# Altium PCB SDReaderPCB.PcbDoc
Units mil, origin at the board's own origin, x right, y up, seen from the top; angles counter-clockwise.
Board outline 6000 x 4000 mil, 2 copper layers (Top Layer, Bottom Layer); 18 components, 14 nets, 65 pads, 2 vias.
Unrouted connection lines stored in the file: 45.
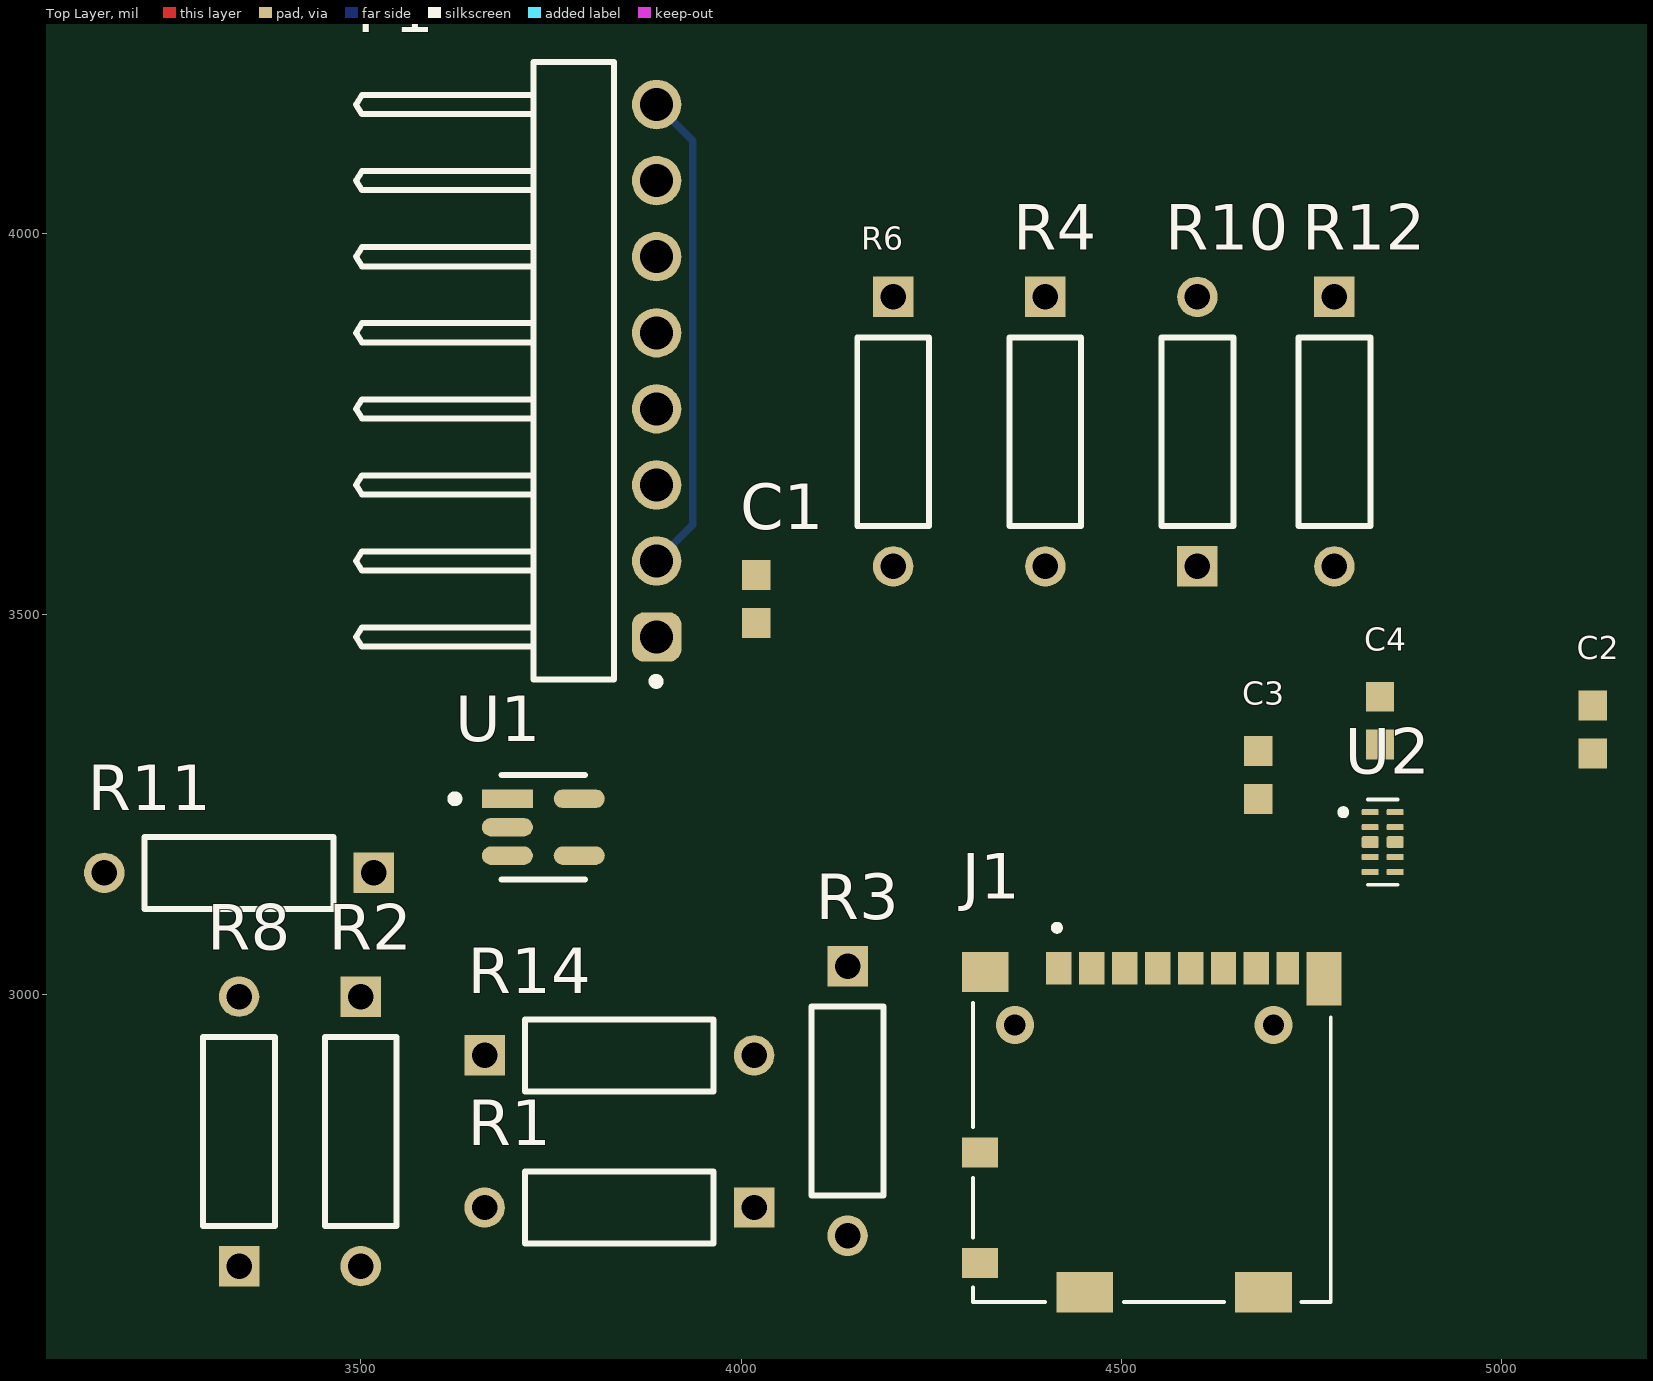
[diagram p0: Top Layer view]
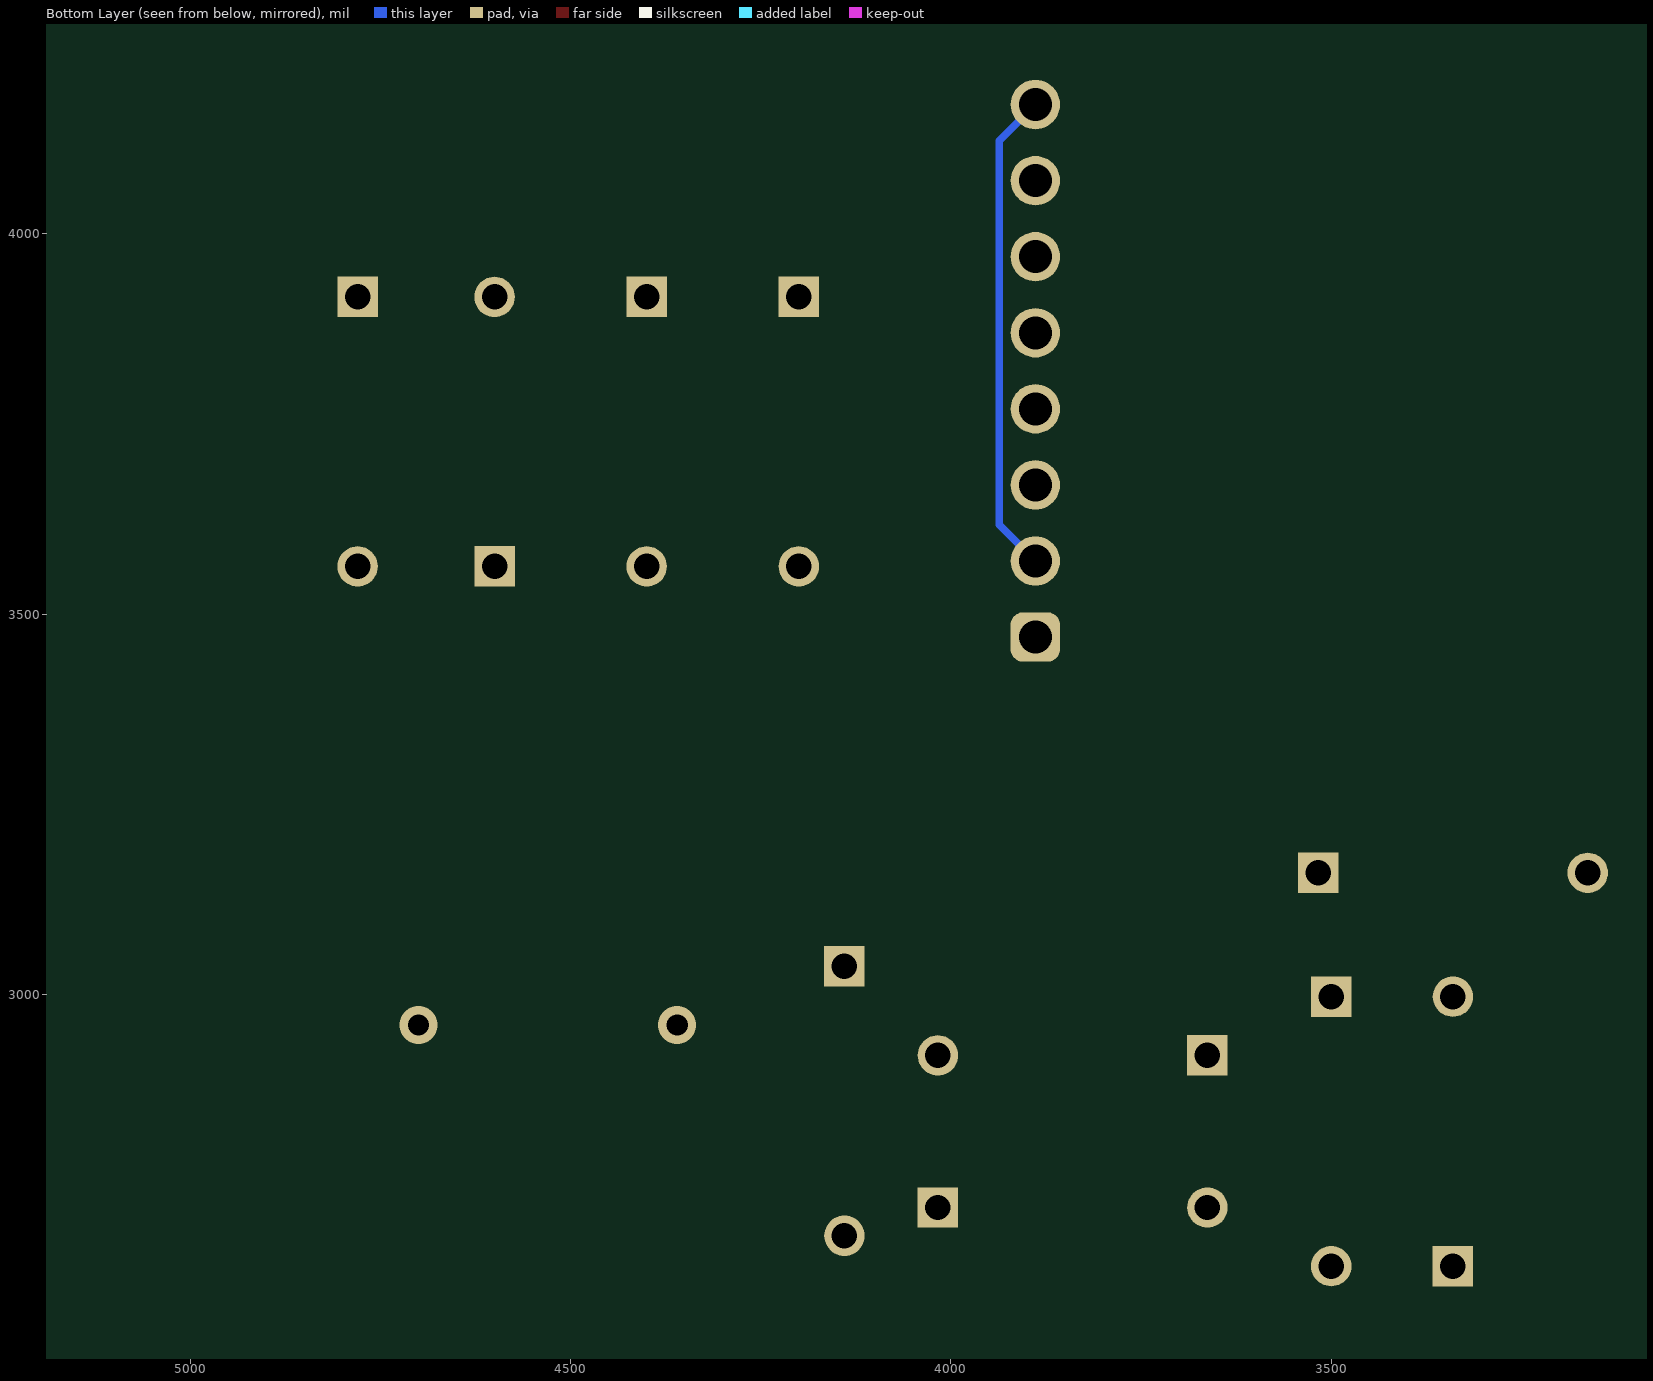
[diagram p1: Bottom Layer view, seen from below]

## Layer stack, top to bottom
Top Solder: solder mask 0.4, Solder Resist, Dk 3.5
Top Layer: signal copper 1.4
Dielectric 1: dielectric 12.6, FR-4, Dk 4.8
Bottom Layer: signal copper 1.4
Bottom Solder: solder mask 0.4, Solder Resist, Dk 3.5

## Board outline
1000,1000 7000,1000 7000,5000 1000,5000

## Design rules (kind name [scope] priority, off if disabled: settings)
Clearance [All] p1: gap=10 ignorepadtopadclearanceinfootprint=TRUE
PolygonConnect [All] p1: connectstyle=Relief reliefconductorwidth=10 reliefentries=4 polygonreliefangle="90 Angle" airgapwidth=10
RoutingVias [All] p1: holewidth=28 width=50 viastyle="Through Hole" minholewidth=28 minwidth=50 maxholewidth=28 maxwidth=50
SolderMaskExpansion [All] p1: expansion=4 istentingtop=FALSE
SupplyNets "Schematic Supply Nets_1" [InNet('+5')] p1: voltage=0.000
SupplyNets "Schematic Supply Nets" [InNet('GND')] p2: voltage=0.000
Width [All] p1: maxlimit=10 minlimit=10 preferedwidth=10
30 further rules are at their usual default settings.

## Components (designator, comment, footprint, x,y, rotation, side; value= is the part's Value field where it differs from the comment)
C1 "Cap" CAPC0603 4020,3520 r90 top value=10uF
C2 "Cap" CAPC0603 5120,3348.5 r90 top value=10uF
C3 "Cap" CAPC0603 4680,3288.5 r90 top value=0.1uF
C4 "Cap" CAPC0603 4840,3360 r90 top value=4.7uF
J1 "104031-0811" MOLEX_104031-0811 4540,2820 r180 top
P1 "61300811021" 61300811021 3780,3820 r270 top
R1 "47K" RESA60-630X240 3840,2720 r180 top
R2 "47K" RESA60-630X240 3500,2820 r270 top
R3 "47K" RESA60-630X240 4140,2860 r270 top
R4 "33" RESA60-630X240 4400,3740 r270 top
R6 "47K" RESA60-630X240 4200,3740 r270 top
R8 "47K" RESA60-630X240 3340,2820 r90 top
R10 "33" RESA60-630X240 4600,3740 r90 top
R11 "33" RESA60-630X240 3340,3160 r180 top
R12 "33" RESA60-630X240 4780,3740 r270 top
R14 "10K" RESA60-630X240 3840,2920 r0 top
U1 "AP2112K-3.3TRG1" FP-SOT25-IPC_A 3740,3220 r0 top
U2 "TPD4E05U06DQAR" IC_TPD4E05U06DQAR 4843.56,3200.32 r0 top

## Footprints (in the part's own frame and the unit in brackets; to place one, negate y for a bottom-side part, rotate by r counter-clockwise, add the part's x,y. Pads: shape width x height; smd on the part's side, far side on the other; paste and mask are expansions set on the pad)
61300811021 [mm] "Pin Header, pitch 2.54 mm, THT, Angled, single row, 8p"
  rrect50% 1.65x1.65 hole 1.1: 1(8.89,2.77)
  round 1.65 hole 1.1: 2(6.35,2.77) 3(3.81,2.77) 4(1.27,2.77) 5(-1.27,2.77) 6(-3.81,2.77) 7(-6.35,2.77) 8(-8.89,2.77)
  silkscreen extent -10.31,-7.27 10.49,2.88, body extent -10.16,-7.27 10.16,3.09, height 2.58
CAPC0603 [mm] "Chip Capacitor, 2-Leads, Body 1.60x0.80mm, IPC Medium Density"
  rect 1x0.95 smd: 1(-0.8,0) 2(0.8,0)
  body extent -0.88,-0.48 0.87,0.48, height 0.8
FP-SOT25-IPC_A [mm]
  rect 1.707x0.616 smd paste+0 mask+0: 1(-1.201,0.95)
  rrect100% 1.707x0.616 smd paste+0 mask+0: 2(-1.201,0) 3(-1.201,-0.95) 4(1.201,-0.95) 5(1.201,0.95)
  silkscreen extent -3.08,-1.75 1.4,1.75, body extent -2.55,-2 2.55,2, height 0.25
IC_TPD4E05U06DQAR [mm]
  rrect25% 0.565x0.2 smd mask+0: 1(-0.417,1) 2(-0.417,0.5) 4(-0.417,-0.5) 5(-0.417,-1) 6(0.417,-1) 7(0.417,-0.5) 9(0.417,0.5) 10(0.417,1)
  rrect25% 0.565x0.4 smd paste-1 mask+0: 3(-0.417,0) 8(0.417,0)
  silkscreen extent -1.42,-1.42 0.5,1.42, body extent -0.5,-1.25 0.5,1.25, height 0.55
MOLEX_104031-0811 [mm]
  rect 0.85x1.1 smd: 1(3.105,-5.45) 2(2.005,-5.45) 3(0.905,-5.45) 4(-0.195,-5.45) 5(-1.295,-5.45) 6(-2.395,-5.45) 7(-3.495,-5.45)
  rect 0.75x1.1 smd: 8(-4.545,-5.45)
  rect 1.2x1 smd: 9(5.74,0.7) 10(5.74,4.4)
  rect 1.55x1.35 smd: G1(5.565,-5.325)
  rect 1.17x1.8 smd: G2(-5.755,-5.1)
  rect 1.9x1.35 smd: G3(-3.73,5.375) G4(2.24,5.375)
  silkscreen extent -5.97,-6.9 5.97,5.7
RESA60-630X240 [mm] "Axial Resistor, 2-Leads, Dia 2.4mm, Body Length 6.3mm"
  rect 1.35x1.35 hole 0.85: 1(-4.5,0)
  round 1.35 hole 0.85: 2(4.5,0)
  silkscreen extent -3.15,-1.2 3.15,1.2, body extent -3.15,-1.2 3.15,1.2, height 2.4

## Part data
C1 C2 C3 C4: Supplier Part Number 1=1276-1000-1-ND, Supplier 1=Digi-Key
J1: "Surface Mount Micro SD Card Connector, with Push In Termination", Package=None, Check_prices=https://www.snapeda.com/parts/104031-0811/Molex/view-part/?ref=eda, MF=Molex, MP=104031-0811, SnapEDA_Link=https://www.snapeda.com/parts/104031-0811/Molex/view-part/?ref=snap
P1: library part CMP-1502-01075-4, "THT Angled Pin Header WR-PHD, Pitch 2.54 mm, Single Row, 8 pins", Color=Black, Contact Resistance=20mΩ, Current Rating=3A, Operating Supply Voltage=250V, Connector Type="Male Pin", Contact Material=Copper, Contact Mating Length=5.9944mm, Contact Plating=Gold, Gender=Male, Lead Pitch=2.54mm, Mount="Through Hole", Number of Contacts=8, Number of Pins=8, Number of Positions=8, Number of Rows=1, Packaging=Bulk, Pitch=2.54mm, RoHS=Compliant, Termination=Solder
R1 R2 R3 R4 R6 R8 R10 R11 R12 R14: library part CMP-1659-00070-1, "Axial Resistor, 1 MOhm, +/- 1%, 250 mW, -55 to 155 degC, 2-Pin THD, RoHS, Bulk", Case\Package=Axial, Max Operating Temperature="155 degC", Min Operating Temperature="-55 degC", Package Quantity=200, Power Rating="250 mW", Resistance="47.5 kohm", Tolerance=1%, Voltage Rating="250 V", ComponentLink1Description="Manufacturer URL", ComponentLink1URL=http://www.yageo.com/, ComponentLink2Description=Datasheet, ComponentLink2URL=http://www.yageo.com/documents/recent/Yageo%20LR_MFR_2013.pdf, DatasheetVersion=Apr-13, Length="0.248 inch", Mount="Through Hole", PackageDescription="2-Pin Axial Lead, Dia 2.4 mm, Body Length 6.3 mm", PackageReference=MFR-25, Packaging=Bulk, RoHSCompliant=true
U1: library part CMP-12756-000035-1, "IC REG LINEAR 3.3V 600MA SOT25", Case/Package=SOT-23-5, Dropout Voltage=250mV, Max Input Voltage=6V, Max Operating Temperature=85°C, Max Output Current=600mA, Min Input Voltage=2.5V, Min Operating Temperature=-40°C, Output Voltage=3.3V, Package Quantity=1, Quiescent Current=55uA, Accuracy=1.5%, Height=1.3mm, Lead Free="Lead Free", Length=3.1mm, Mount="Surface Mount", Number of Outputs=1, Number of Pins=5, Number of Regulators=1, Output Current=600mA, Output Type=Fixed, Packaging="Tape and Reel", Polarity=Positive, Width=1.7mm
U2: "Quad 0.5-pF, 5.5-V, Â±12-kV ESD protection diode for USB, HDMI & High Speed Interfaces", Package="USON-10 Texas Instruments", Availability="In Stock", Check_prices=https://www.snapeda.com/parts/TPD4E05U06DQAR/Texas+Instruments/view-part/?ref=eda, MF="Texas Instruments", MP=TPD4E05U06DQAR, Price=None, Purchase-URL=https://pricing.snapeda.com/search/part/TPD4E05U06DQAR/?ref=eda, SnapEDA_Link=https://www.snapeda.com/parts/TPD4E05U06DQAR/Texas+Instruments/view-part/?ref=snap

## Via types
v1: diameter 50, hole 28, Top Layer to Bottom Layer, 2 vias

## Nets (pads, with @x,y where several pads share a name; then routed paths per layer and width w, separated by ;. In a path a pad name is that pad's centre, name@x,y a point inside that pad or via, vN(x,y) a via of type N, cw(c..) or ccw(c..) an arc to the next point about the centre after c; other vN are vias at no path point)
+3V3_SD: C2.2 C3.2 C4.2 J1.4 R1.2 R2.2 R3.2 R6.2 R8.1 R14.1 U1.5
+5: C1.1 P1.1 U1.1 U1.3
CARD_DETECT: J1.9 P1.7 R14.2
GND: C1.2 C2.1 C3.1 C4.1 J1.6 J1.10 J1.G1 J1.G2 J1.G3 J1.G4 P1.2 P1.8 U1.2 U2.3 U2.8 | length 639.3
  Bottom Layer w10: P1.2 3936.54,3617.48 3936.54,4122.52 P1.8
NetJ1_1: J1.1 R8.2
NetJ1_8: J1.8 R6.1
SD_CS: J1.2 R1.1 R12.2 U2.5
SD_MISO: J1.7 R3.1 R10.1 U2.4
SD_MOSI: J1.3 R2.1 R11.2 U2.2
SD_SCK: J1.5 R4.2 U2.1
SPI_CS: P1.6 R12.1
SPI_MISO: P1.5 R10.2
SPI_MOSI: P1.4 R11.1
SPI_SCK: P1.3 R4.1
pads on no net: U1.4 U2.6 U2.7 U2.9 U2.10
copper on no net:
  other v1: 4360,2960 4700,2960